# Altium PCB FMM-v1.0.PcbDoc (part 4 of 5)
Units mm, origin at the board's own origin, x right, y up, seen from the top; angles counter-clockwise.
Board outline 115 x 96 mm, 4 copper layers (Top Layer, Power Layer, Ground Layer, Bottom Layer), stack 1.57 mm thick; 218 components, 129 nets, 744 pads, 321 vias.
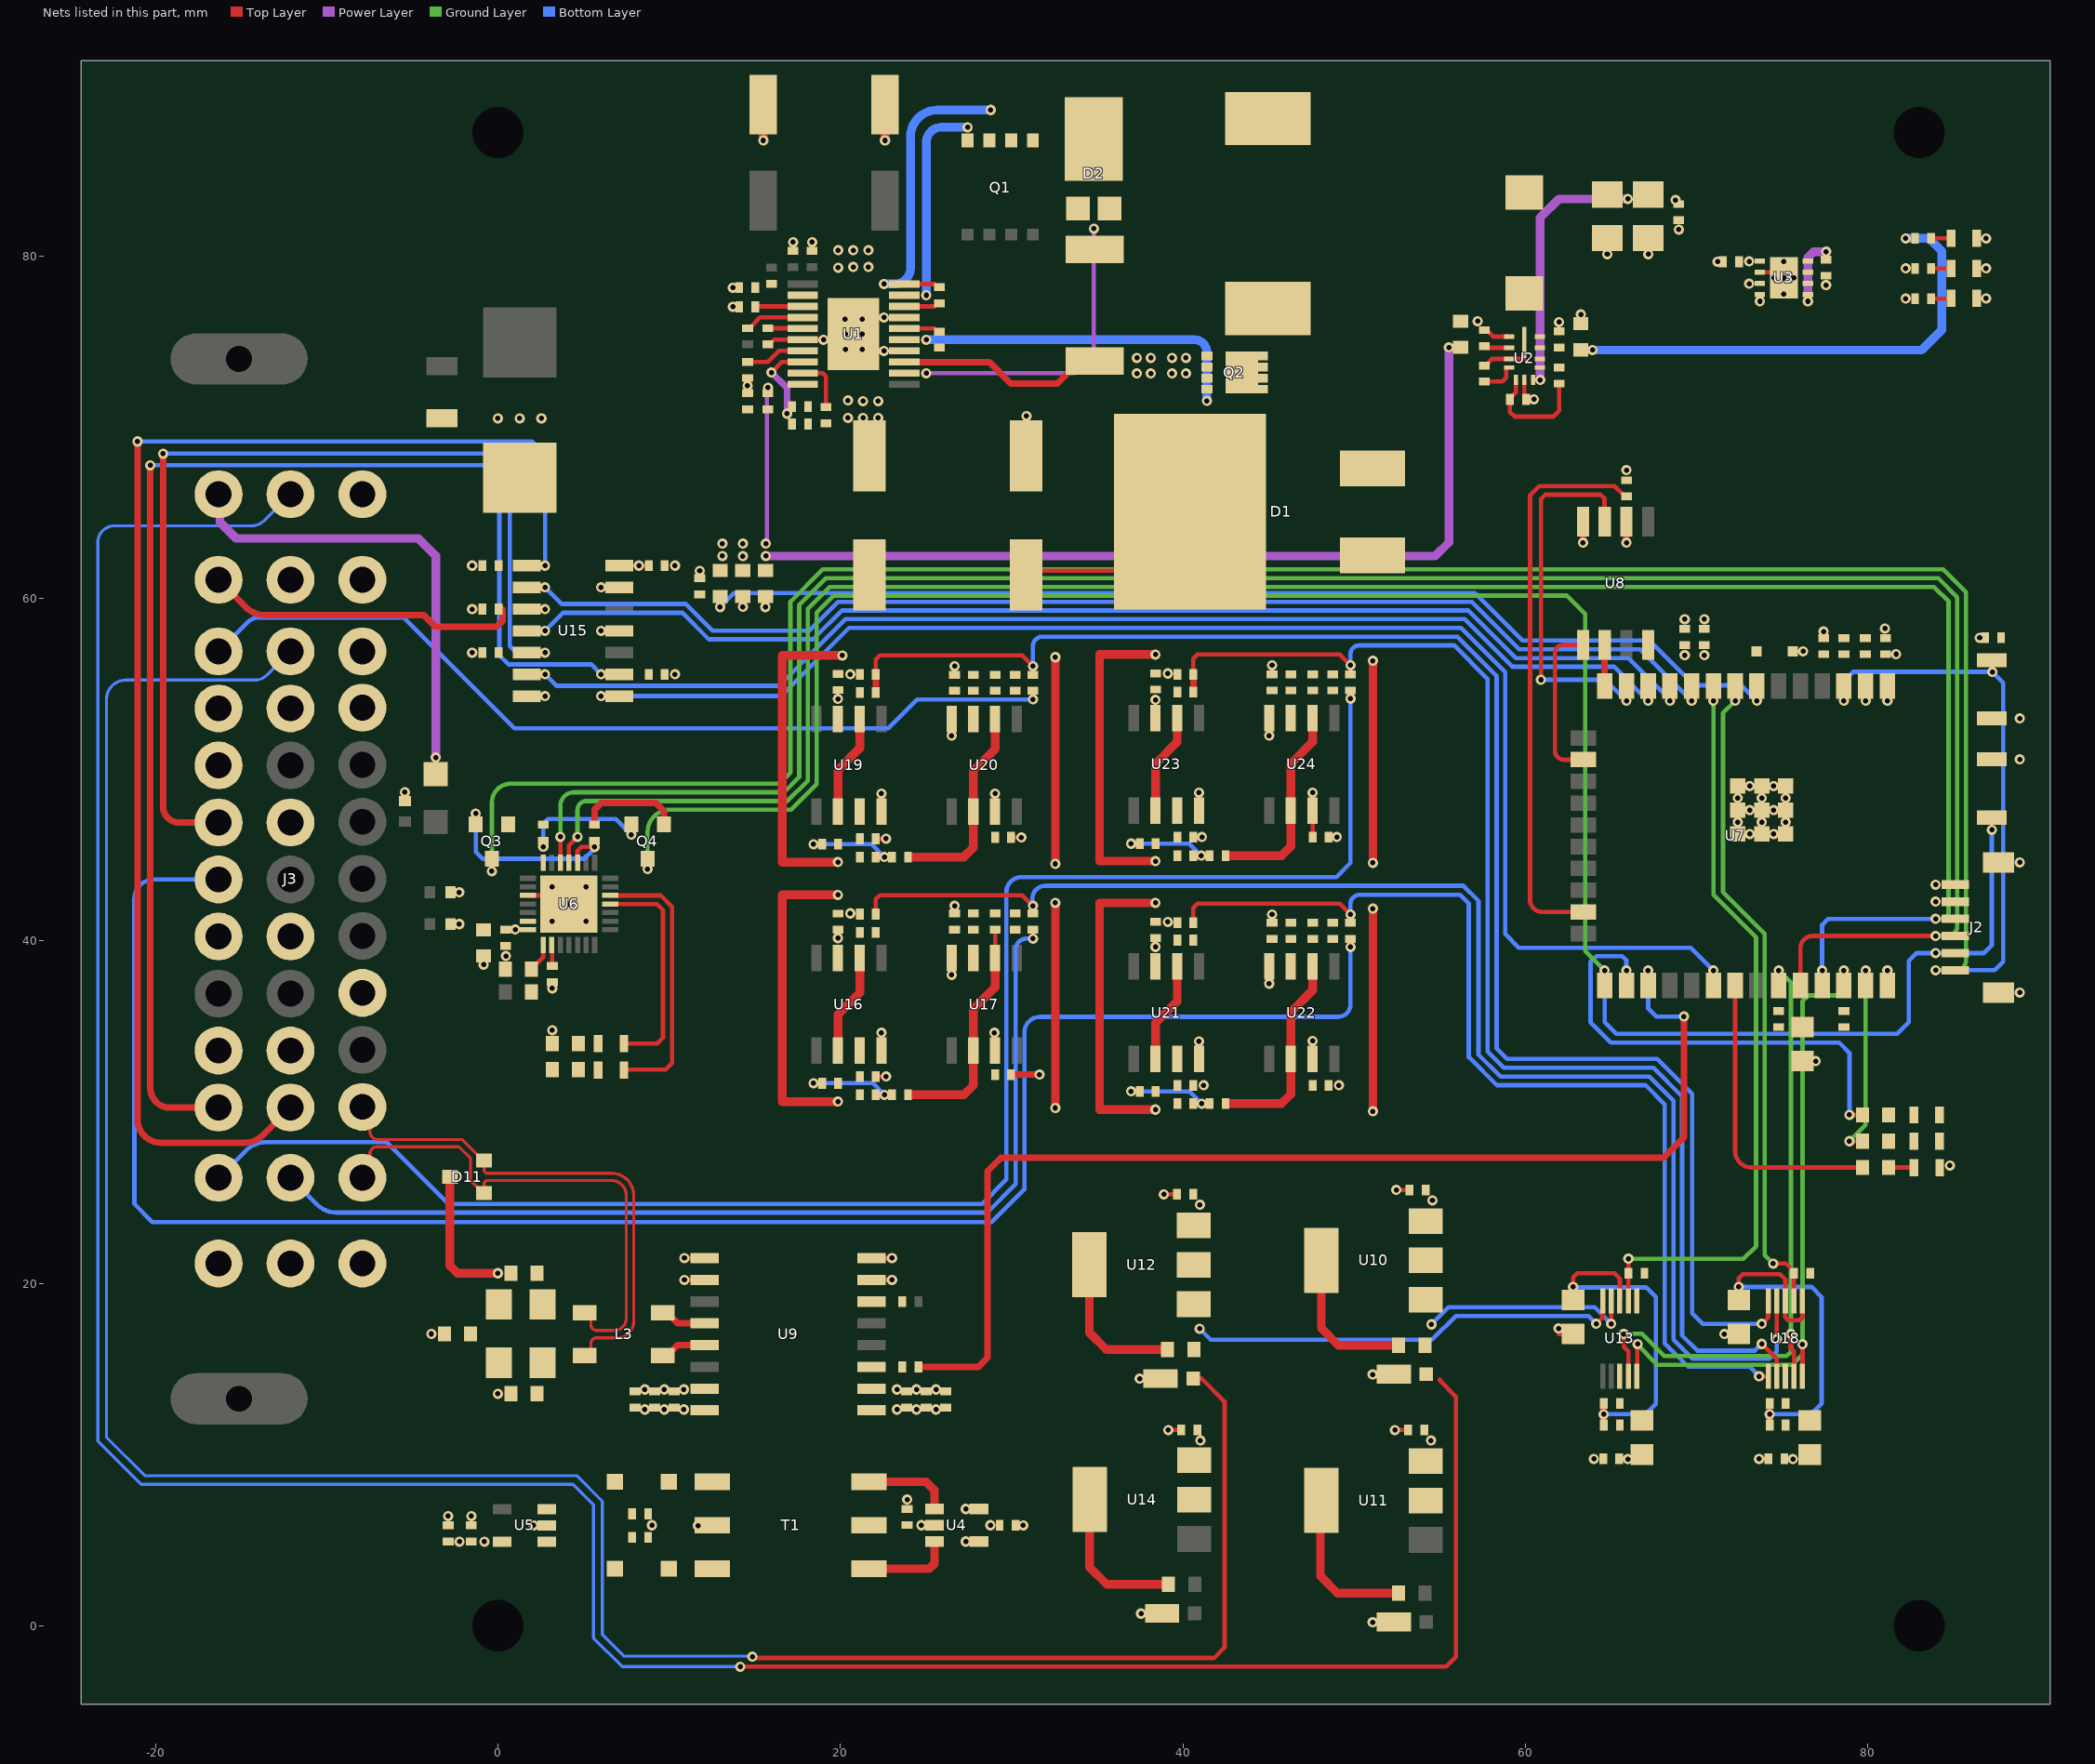
[diagram p4: the nets of this part, all layers, seen from the top]

## Part data (continued)
U16 U17 U19 U20 U21 U22 U23 U24: "IC OPAMP GP 1 CIRCUIT 8SOIC", Case/Package=D, Input Bias Current=10pA, Input Offset Voltage (Vos)=500uV, LCSC Part Number=C13388, Manufacturer="Texas Instruments", Max I/O Voltage=1mV, Max Operating Temperature=85°C, Max Supply Voltage=5.5V, Min Operating Temperature=-40°C, Min Supply Voltage=2.7V, Operating Supply Current=5.2mA, Output Current per Channel=40mA, Package Quantity=2500, Power Supply Rejection Ratio (PSRR)=87.96dB, Supplier Part Number=296-41366-1-ND, Supply Current=7.5mA, Voltage Gain=122dB, Amplifier Type="GENERAL PURPOSE", Bandwidth=38MHz, Category="Amplifiers - Op Amps, Buffer, Instrumentation", Common Mode Rejection Ratio=66dB, ComponentLink1Description=https://datasheet.ciiva.com/1814/opa350-1814331.pdf?src-supplier=Digikey, ComponentLink1URL=https://datasheet.ciiva.com/1814/opa350-1814331.pdf?src-supplier=Digikey, ComponentLink2Description=https://datasheet.ciiva.com/14347/sbos099c-14347229.pdf?src-supplier=Avnet, ComponentLink2URL=https://datasheet.ciiva.com/14347/sbos099c-14347229.pdf?src-supplier=Avnet, Gain Bandwidth Product=38MHz, Item Type=IC, Lead Free="Lead Free", Manufacturer Part Number=OPA350UA/2K5, Number of Channels=1, Number of Circuits=1, Number of Elements=1, Packaging="Tape and Reel", Pins=8, Pricing="1=2.98, 10=2.675, 25=2.5292, 100=2.1921, 250=2.07964, 500=1.86606, 1000=1.57378 (USD)", Radiation Hardening=No, RoHS=Yes, RoHS Compliant=Yes, Series=MicroAmplifier™, Slew Rate=22V/µs, Stock=2896, Supplier=Digikey, Technology=CMOS, Unity Gain Bandwidth Product=38MHz, Weight=0.002677oz

## Free pads (board coordinates)
  round 0 hole 3 unplated: 6(0,0) 6(0,87.2) 6(83,0) 6(83,87.2)

## Via types
v1: diameter 0.6, hole 0.3, Top Layer to Bottom Layer, 297 vias
v2: diameter 0.6, hole 0.3, Top Layer to Bottom Layer, tented both sides, 24 vias

## Nets (pads, with @x,y where several pads share a name; then routed paths per layer and width w, separated by ;. In a path a pad name is that pad's centre, name@x,y a point inside that pad or via, vN(x,y) a via of type N, cw(c..) or ccw(c..) an arc to the next point about the centre after c; other vN are vias at no path point)
3V3: C25.2 C26.2 C27.2 C32.1 C33.2 C35.2 C36.2 C38.2 C39.2 C46.2 C47.1 C48.2 C54.1 C56.1 C57.1 C58.1 C63.1 C65.1 C68.1 C73.1 C75.1 C81.1 C82.1 FB1.1 FB2.2 FB4.2 J2.1 R14.1 R15.1 R18.2 R20.2 R22.2 R27.2 R38.2 R39.2 R40.2 R41.2 T1.2 U3.1 U3.3 U4.2 U6.6 U6.7 U7.2 U8.8 U9.1 U15.11 U15.13 U15.14 U16.7 U17.7 U19.7 U20.7 U21.7 U22.7 U23.7 U24.7 | length 7.8
  Top Layer w0.254: v1(3.176,37.222) R15.1@3.176,37.584 ; U15.14@7.087,61.91 v1(8.231,61.91) C58.1@8.807,61.91 ; v1(28.989,34.634) 28.989,34.381 29.035,34.335 U17.7@29.035,33.592 ; U20.7@29.035,47.553 v1(29.035,48.604) ; U22.7@47.577,33.1 v1(47.577,34.151) ; C81.1@47.577,46.062 U24.7@47.577,47.604 v1(47.577,48.655)
  other v1: 24.726,5.87 28.76,5.87 65.981,9.73 75.625,9.73 23.302,12.631 24.445,12.631 25.588,12.631 76.952,32.97 3.175,34.779 38.403,39.647 19.861,40.164 1.017,40.655 83.96,43.282 79.873,54.012 38.405,54.077 19.861,54.125 10.345,55.56 69.306,56.672 70.449,56.672 81.648,56.738 -1.506,56.83 77.418,58.061 6.02,58.1 -1.506,59.37 6.02,60.64 -1.506,61.91 65.905,67.489 82.211,77.504 73.072,78.376 73.072,79.676
5V: C20.2 C21.2 C22.2 C24.1 D7.2 J3.23 J3.27 J3.31 J3.36 L2.2 R13.1 U2.7 U3.5 U3.8 | length 47.1
  Top Layer w0.254: D7.2@-3.632,49.731 v1(-3.632,50.704) ; U2.7@60.445,72.756 v1(60.866,72.756)
  Power Layer w0.508: J3.27@-16.314,66.081 -16.235,66.003 -16.235,64.449 -15.286,63.5 -4.651,63.5 -3.632,62.481 v1(-3.632,50.704) ; v1(60.866,72.756) 60.866,82.228 61.961,83.322 v1(65.989,83.322) ; v1(76.5,77.346) 76.5,79.9 76.842,80.242 v1(77.566,80.242)
  other v1: 82.211,79.268 68.771,83.258
5V-ISO: C28.2 C29.2 C43.2 C44.1 C45.2 U5.5 U9.16
  other v1: -2.24,4.91 -0.792,4.91 8.57,12.631 9.713,12.631 10.856,12.631
12V: C6.1 C7.1 C8.2 C9.2 C16.2 C17.2 C18.2 C19.2 C49.2 C50.2 C51.2 C55.2 D1.3 R4.2 R7.2 R10.1 U1.10 U2.2 U2.9 U2.10 U10.3 U11.3 U12.3 U14.3 | length 101.7
  Top Layer w0.254: C7.1@30.084,61.617 36.978,61.617 D1.3@40.41,65.049 ; C18.2@57.6,74.724 57.692,74.633 59.043,74.633 U2.2@59.045,74.631
  Power Layer w0.254: v1@15.771,63.199 15.71,63.26 15.71,72.241 v1(15.771,72.301)
  Power Layer w0.508: v1@15.777,62.468 54.731,62.468 55.537,63.274 v1@55.537,74.635
  Bottom Layer w0.508: v1(63.919,74.498) 83.134,74.498 84.328,75.692 84.328,80.263 83.57,81.021 v1(82.211,81.021)
  other v1: 41.021,10.823 54.49,10.823 40.996,24.587 54.576,24.841 13.106,62.468 14.304,62.464 15.65,62.468 14.304,63.189 13.106,63.193 15.65,63.193 55.537,74.651
ACT-LED: R28.2 U7.31 | length 17.7
  Top Layer w0.254: U7.31@72.253,37.388 72.253,27.712 ccw(c73.205,27.712) 73.205,26.76 R28.2@79.697,26.76
ADC: D3.2 R4.1 R6.2 U7.7 | length 64.1
  Top Layer w0.254: v1(12.979,59.495) R4.1@12.979,60.093
  Bottom Layer w0.254: v1(12.979,59.495) 13.788,60.304 57.065,60.304 59.837,57.531 67.25,57.531 69.865,54.917 72.618,54.917 v1(73.523,54.012)
CAN_N: C42.1 D11.1 J3.12 L3.3 R32.1 | length 30.5
  Top Layer w0.178: J3.12@-7.914,26.158 -7.476,26.595 -7.476,27.558 cw(c-7.068,27.558) -7.397,27.8 cw(c-7.068,27.558) -7.31,27.887 cw(c-7.068,27.558) -7.068,27.966 -2.279,27.966 -1.594,27.281 -1.594,25.988 -1.19,25.584 -1.125,25.584 D11.1@-0.803,25.263 -0.803,25.893 -0.699,25.997 6.642,25.997 cw(c6.642,25.146) 7.493,25.146 7.493,17.935 cw(c6.805,17.935) 6.805,17.247 5.771,17.247 cw(c5.771,17.585) 5.433,17.585 5.433,17.912 L3.3@5.071,18.275
CAN_P: C40.2 D11.2 J3.11 L3.4 R29.2 | length 30.7
  Top Layer w0.178: J3.11@-7.914,30.302 -7.476,29.864 -7.476,28.861 ccw(c-7.012,28.861) -7.012,28.398 -2.1,28.398 -1.186,27.484 -1.125,27.484 D11.2@-0.803,27.163 -0.803,26.533 -0.699,26.429 6.642,26.429 cw(c6.642,25.146) 7.925,25.146 7.925,17.756 cw(c6.984,17.756) 6.984,16.816 5.771,16.816 ccw(c5.771,16.478) 5.433,16.478 5.433,16.137 L3.4@5.071,15.775
CS: R27.1 U7.23 U8.2 | length 35.1
  Top Layer w0.254: U7.23@64.008,41.688 U7.23@63.383,41.688 60.98,41.688 cw(c60.98,42.394) 60.713,41.741 cw(c60.98,42.394) 60.327,42.127 cw(c60.98,42.394) 60.274,42.394 60.274,66.015 60.818,66.559 65.208,66.559 65.816,65.951 R27.1@65.905,65.951 ; U8.2@65.905,64.478 U8.2@65.907,64.476 ; v1@65.907,63.252 v1(65.909,63.25)
  Top Layer w0.381: v1@65.907,63.252 U8.2@65.907,64.476
DC_IN: F1.1 J3.1 J3.2
DTR: Q4.2 R17.1 U6.28 | length 7.6
  Top Layer w0.254: v1(7.788,46.197) Q4.2@7.788,46.796
  Bottom Layer w0.254: v1(2.649,45.485) 2.649,46.833 2.92,47.104 6.88,47.104 v1(7.788,46.197)
EN: C34.2 C37.2 J2.6 Q3.3 R22.1 SW2.1 U7.3 | length 158
  Top Layer w0.254: v1(-0.356,44.063) Q3.3@-0.356,44.796
  Ground Layer w0.254: v1(-0.356,44.063) -0.356,48.062 cw(c0.761,48.062) -0.15,48.708 cw(c0.761,48.062) 0.115,48.973 cw(c0.761,48.062) 0.761,49.178 16.422,49.178 17.083,49.84 17.083,59.805 18.975,61.697 84.4,61.697 85.732,60.364 85.732,38.847 cw(c85.168,38.847) 85.168,38.282 v1(83.96,38.282)
  Bottom Layer w0.254: v1(78.603,54.012) 78.603,55.159 79.146,55.702 v1(87.274,55.702) 87.909,55.067 87.909,38.771 87.42,38.282 v1(83.96,38.282)
FLOW-RDN-1: U7.10 U15.2 | length 71.1
  Bottom Layer w0.254: v1(2.755,60.64) 3.727,59.668 10.984,59.668 12.537,58.115 18.19,58.115 19.871,59.796 56.879,59.796 59.651,57.023 66.702,57.023 v1(69.713,54.012)
FLOW-RDN-2: U7.11 U15.4 | length 69.7
  Bottom Layer w0.254: v1(2.755,58.1) 3.811,59.156 10.778,59.156 12.326,57.607 18.401,57.607 20.081,59.288 56.669,59.288 59.441,56.515 66.017,56.515 68.443,54.089 v1(68.443,54.012)
FLOW-RDN-3: U7.12 U15.6 | length 68.3
  Bottom Layer w0.254: v1(2.755,55.56) 3.425,54.889 16.401,54.889 20.291,58.78 56.459,58.78 59.231,56.007 65.178,56.007 v1(67.173,54.012)
FLOW-RDN-4: U7.30 U15.8 | length 83.9
  Bottom Layer w0.254: v1(6.02,54.29) 16.52,54.29 20.502,58.272 56.248,58.272 58.825,55.695 58.825,40.395 59.621,39.599 69.648,39.599 v1(70.983,38.264)
FLOW-SNS-1: J3.24 R38.1 U15.1 | length 80.7
  Top Layer w0.381: v1(-21.044,69.159) -21.047,69.156 -21.047,29.572 ccw(c-19.686,29.572) -19.686,28.212 -14.793,28.212 ccw(c-14.793,29.732) -13.718,28.657 J3.24@-12.114,30.261
  Bottom Layer w0.254: v1(-21.044,69.159) 1.995,69.159 2.755,68.398 v1(2.755,61.91)
FLOW-SNS-2: J3.28 R39.1 U15.3 | length 18.7
  Top Layer w0.381: J3.28@-16.314,61.081 -14.709,59.477 ; -14.708,59.476 ccw(c-13.587,60.599) -13.587,59.012 -4.326,59.012 -3.66,58.347 -0.073,58.347 0.285,58.704 0.285,59.32 0.235,59.37 R39.1@0.031,59.37
  other v1: 2.755,59.37
FLOW-SNS-3: J3.32 R40.1 U15.5 | length 57.5
  Top Layer w0.381: v1(-19.555,68.448) -19.558,68.445 -19.558,47.837 ccw(c-18.632,47.837) -19.512,47.551 ccw(c-18.632,47.837) -18.919,46.957 ccw(c-18.632,47.837) -18.632,46.911 J3.32@-16.314,46.911
  Bottom Layer w0.254: v1(-19.555,68.448) -0.282,68.448 0.687,67.479 0.687,57.205 1.062,56.83 v1(2.755,56.83)
FLOW-SNS-4: J3.37 R41.1 U15.9 | length 78.5
  Top Layer w0.381: v1(-20.302,67.767) -20.302,31.397 ccw(c-19.167,31.397) -19.167,30.261 J3.37@-16.314,30.261
  Bottom Layer w0.254: v1(-20.302,67.767) -0.51,67.767 0.085,67.173 0.085,56.681 0.622,56.144 5.436,56.144 v1(6.02,55.56)
GND: C1.1 C3.2 C4.2 C5.1 C6.2 C7.2 C8.1 C9.1 C10.1 C11.1 C14.1 C16.1 C17.1 C18.1 C19.1 C20.1 C21.1 C22.1 C23.1 C24.2 C25.1 C26.1 C27.1 C32.2 C33.1 C34.1 C35.1 C36.1 C37.1 C38.1 C39.1 C46.1 C47.2 C48.1 C49.1 C50.1 C51.1 C54.2 C55.1 C56.2 C57.2 C58.2 C59.1 C60.1 C61.1 C63.2 C65.2 C68.2 C69.1 C70.1 C71.1 C73.2 C75.2 C76.1 C77.1 C78.1 C81.2 C82.2 C83.1 C84.1 C85.1 D3.1 D4.2 D8.1 D9.1 D10.1 D12.1 D13.1 D14.1 D15.1 FB3.2 FB5.2 J2.2 J2.MP1 J2.MP2 J3.3 J3.4 J3.9 J3.15 J3.17 J3.19 J3.21 J3.26 J3.30 J3.34 J3.39 LED1.2 LED2.2 LED3.2 LED6.2 LED7.2 LED8.2 Q2.1 Q2.2 Q2.3 R3.1 R5.2 R6.1 R8.1 R11.1 R19.1 SW1.2 SW2.2 U1.6 U1.13 U1.14 U1.17 U1.21 U2.1 U2.6 U2.11 U3.2 U3.4 U3.6 U3.7 U3.9 U4.4 U4.5 U6.3 U6.29 U7.1 U7.38 U7.39 U8.4 U9.2 U9.7 U9.8 U15.7 U16.4 U17.4 U19.4 U20.4 U21.4 U22.4 U23.4 U24.4 | length 187.7
  Top Layer w0.254: D10.1@-2.776,40.977 v1(-2.262,40.977) ; D9.1@-2.776,42.831 v1(-2.262,42.831) ; v1(-0.838,38.602) C33.1@-0.838,39.116 ; U6.3@1.749,42.651 2.826,42.651 3.649,42.651 v2(4.149,42.151) ; v1(13.728,77.024) 14.093,77.024 R8.1@14.094,77.025 ; v1(13.728,78.141) 14.093,78.141 R3.1@14.094,78.142 ; v1(14.3,59.499) C8.1@14.3,60.096 ; v1(15.624,59.495) C9.1@15.624,60.093 ; C11.1@15.771,74.831 15.86,74.831 16.131,75.102 U1.6@17.172,75.102 ; U1.6@17.795,75.102 20.44,75.102 U1.21@20.765,75.427 ; U9.7@21.827,20.2 v1(23.013,20.2) ; U9.8@21.827,21.47 v1(23.013,21.47) ; C60.1@22.07,32.076 v1(22.668,32.076) ; C70.1@22.07,45.96 v1(22.668,45.96) ; v1(26.495,38.01) U17.4@26.495,38.992 ; v1(26.495,51.98) U20.4@26.495,52.953 ; C63.2@29.975,46.037 v1(30.572,46.037) ; C26.1@30.239,5.87 C26.1@30.239,5.87 30.671,5.869 v1(30.672,5.868) ; v1(38.889,25.197) C51.1@39.657,25.197 ; v1(39.143,11.433) C55.1@39.911,11.433 ; C84.1@40.612,46.062 v1(41.115,46.062) ; v1(45.037,37.502) U22.4@45.037,38.5 ; v1(45.037,51.98) U24.4@45.037,53.004 ; C85.1@45.21,55.562 v1(45.21,56.09) ; C81.2@48.517,46.062 48.519,46.064 49.11,46.064 v1@49.113,46.067 ; v1(51.087,0.205) 52.304,0.205 D13.1@52.316,0.217 ; v1(52.383,11.433) C50.1@53.151,11.433 ; v1(52.47,25.451) C49.1@53.238,25.451 ; C18.1@57.41,75.765 57.512,75.664 C18.1@57.6,75.664 ; C18.1@57.583,75.735 57.756,75.562 57.856,75.562 58.138,75.281 U2.1@59.045,75.281 ; U2.6@59.945,72.756 59.945,71.825 60.069,71.701 C23.1@60.069,71.613 ; 61.945,17.034 FB3.2@62.789,17.034 ; C16.1@63.239,76.032 v1(63.239,76.578) ; v1(64.785,80.099) C21.1@64.785,81.036 ; C20.1@67.176,81.036 67.183,81.029 v1(67.183,80.099) ; v1(71.622,17.034) FB5.2@72.466,17.034 ; U3.2@73.7,79.037 74.735,79.037 75.06,78.712 U3.9@75.1,78.712 ; U7.39@74.503,49.034 U7.39@73.803,49.034 U7.39@73.103,49.034 U7.39@72.403,49.034 U7.39@72.403,48.334 U7.39@72.403,47.634 U7.39@72.403,46.934 U7.39@72.403,46.234 U7.39@73.103,46.234 U7.39@73.803,46.234 U7.39@74.503,46.234 U7.39@75.203,46.234 U7.39@75.203,46.934 U7.39@75.203,47.634 U7.39@75.203,48.334 U7.39@75.203,49.034 ; LED3.2@86.36,77.516 v1(86.906,77.516) ; LED2.2@86.36,79.268 v1(86.906,79.268) ; LED1.2@86.36,81.021 v1(86.906,81.021)
  Top Layer w0.381: U1.13@23.735,73.802 28.694,73.802 29.953,72.542 32.661,72.542 33.335,73.216 33.335,73.254 33.944,73.863 R5.2@34.844,73.863 ; C56.2@29.975,32.185 v2(31.623,32.185) ; v1@63.365,63.254 U8.4@63.365,64.478
  Top Layer w0.508: v1(15.494,86.741) C3.2@15.494,88.83 ; v1(19.86,30.612) 16.597,30.612 16.597,42.681 v1(19.86,42.681) ; v1(19.86,44.597) 16.596,44.597 16.596,56.667 v1(20.114,56.667) ; v1(22.606,86.741) C4.2@22.606,88.83 ; v1(32.556,30.238) v1(32.556,42.221) ; v1(32.556,44.493) v1(32.556,56.562) ; v1(38.402,30.145) 35.139,30.145 35.139,42.214 v1(38.402,42.214) ; v1(38.402,44.652) 35.139,44.652 35.139,56.722 v1(38.402,56.722) ; v1(51.098,30.04) v1(51.098,41.878) ; v1(51.098,44.548) v1(51.098,56.353)
  other v1: 37.561,0.711 27.326,4.92 27.326,6.82 23.901,7.372 64.005,9.746 73.649,9.746 23.302,13.799 24.445,13.799 25.588,13.799 37.473,14.425 51.087,14.679 61.945,17.364 84.785,26.873 41.21,31.559 49.114,31.559 40.942,34.126 22.4,34.634 88.879,36.982 81.143,38.264 0.471,39.116 39.116,41.109 45.21,41.536 20.574,41.6 26.668,42.04 83.96,42.282 88.879,44.582 48.986,46.067 22.4,48.604 40.942,48.655 -5.436,48.677 88.879,50.595 88.879,52.981 81.143,54.012 2.755,54.29 20.574,55.562 39.116,55.612 26.668,56.039 76.221,56.903 86.533,57.698 81.001,58.242 69.306,58.782 70.449,58.782 11.786,61.609 10.345,61.91 63.369,63.25 0,70.506 1.27,70.506 2.54,70.506 30.863,70.642 60.497,71.618 14.58,72.415 37.313,73.127 38.125,73.127 39.37,73.127 40.183,73.127 37.313,74.041 38.125,74.041 39.37,74.041 40.183,74.041 22.541,74.451 19.014,75.104 61.969,76.134 57.218,76.179 22.541,76.401 73.7,77.346 77.561,78.292 71.222,79.656 17.231,80.797 18.349,80.797 68.961,81.534
  other v2: 3.163,41.151 5.149,41.151 3.176,43.151 5.149,43.151 20.44,70.535 21.321,70.535 22.202,70.535 21.321,71.514 22.202,71.514 20.44,71.551 20.307,74.545 21.285,74.545 20.307,75.426 21.285,75.426 20.269,76.307 21.285,76.307 19.874,79.306 20.755,79.344 21.636,79.344 19.874,80.322 20.755,80.322 21.636,80.322
IO0: J2.5 Q4.3 SW1.1 U7.25 | length 127.9
  Top Layer w0.254: v1(8.738,44.19) Q4.3@8.738,44.796
  Ground Layer w0.254: v1(8.738,44.19) 8.738,46.338 cw(c10.054,46.338) 8.79,46.707 cw(c10.054,46.338) 9.685,47.602 cw(c10.054,46.338) 10.054,47.654 17.122,47.654 18.607,49.14 18.607,59.174 19.589,60.155 62.425,60.155 63.5,59.08 63.5,39.397 v1(64.633,38.264)
  Bottom Layer w0.254: v1(64.633,38.264) 64.633,35.24 65.303,34.569 81.712,34.569 82.398,35.255 82.398,38.826 82.854,39.282 v1(83.96,39.282) 86.78,39.282 87.243,39.745 v1(87.243,46.482)
IO4: R24.1 U7.26 | length 26.7
  Top Layer w0.254: v1(78.929,29.833) R24.1@79.697,29.833
  Bottom Layer w0.254: v1(65.903,38.264) 65.903,38.861 65.654,39.111 64.14,39.111 63.805,38.775 63.805,35.253 64.999,34.059 78.334,34.059 78.929,33.464 v1(78.929,29.833)
IO23: R23.1 U7.37 | length 11.1
  Top Layer w0.254: v1(78.929,28.297) R23.1@79.697,28.297
  Ground Layer w0.254: v1(78.929,28.297) 79.873,29.241 v1(79.873,38.264)
IO32: R48.1 U7.8 U18.2 | length 37.5
  Top Layer w0.254: v1(74.472,21.151) 75.212,21.151 75.689,20.675 R48.1@75.689,20.586 ; U18.2@75.684,18.976 R48.1@75.684,20.556
  Ground Layer w0.254: v1(72.253,54.012) 71.544,53.303 71.544,42.845 73.984,40.405 73.984,21.654 74.472,21.166 v1(74.472,21.151)
IO33: R36.1 U7.9 U13.2 | length 43.1
  Top Layer w0.254: U13.2@66.015,18.976 R36.1@66.015,20.556 ; R36.1@66.019,20.586 v1(66.019,21.43)
  Ground Layer w0.254: v1(66.019,21.43) 72.738,21.43 73.476,22.168 73.476,40.195 70.983,42.688 v1(70.983,54.012)
ISO-GND: C28.1 C29.1 C30.1 C31.1 C40.1 C41.2 C42.2 C43.1 C44.2 C45.1 D11.3 J3.13 T1.5 U5.2 U9.9 U9.10 U9.15 | length 10.5
  Top Layer w0.254: v1(10.89,20.2) U9.10@12.077,20.2 ; v1(10.89,21.47) U9.9@12.077,21.47
  Top Layer w0.508: D11.3@-2.803,26.213 -2.803,21.028 -2.362,20.587 v1(-0.003,20.587)
  other v1: 2.083,5.86 11.684,5.842 9.001,5.87 -2.907,6.404 -1.553,6.404 -0.003,13.545 8.57,13.799 9.713,13.799 10.856,13.799 -3.892,17.043
MISO: U7.14 U8.6 | length 2.4
  Top Layer w0.254: U7.14@64.633,54.888 U7.14@64.633,54.888
  Top Layer w0.381: U7.14@64.633,54.888 U8.6@64.635,57.278
MOSI: U7.16 U8.5 | length 9.6
  Top Layer w0.254: U8.5@63.365,57.278 62.194,57.278 ccw(c62.194,56.806) 62.014,57.242 ccw(c62.194,56.806) 61.757,56.986 ccw(c62.194,56.806) 61.722,56.806 61.722,51.108 ccw(c62.252,51.108) 61.778,50.871 ccw(c62.252,51.108) 62.015,50.634 ccw(c62.252,51.108) 62.252,50.578 U7.16@63.383,50.578
NetC1_2: C1.2 U1.16 | length 2.1
  Top Layer w0.254: U1.16@23.735,75.752 25.518,75.752 25.692,75.578 C1.2@25.781,75.578
NetC2_1: C2.1 D2.3 L1.1 Q1.1 Q1.2 Q1.3 U1.20 | length 17.5
  Top Layer w0.254: U1.20@23.735,78.352 25.512,78.352 25.692,78.172 C2.1@25.781,78.172
  Bottom Layer w0.508: v1(22.541,78.355) 23.169,78.355 ccw(c23.169,79.277) 23.498,78.416 ccw(c23.169,79.277) 24.029,78.948 ccw(c23.169,79.277) 24.09,79.277 24.09,86.943 cw(c25.666,86.943) 24.192,87.5 cw(c25.666,86.943) 25.109,88.417 cw(c25.666,86.943) 25.666,88.519 v1(28.778,88.519)
NetC2_2: C2.2 U1.18 | length 2.1
  Top Layer w0.254: U1.18@23.735,77.052 25.512,77.052 25.692,77.232 C2.2@25.781,77.232
NetC10_2: C10.2 U1.7 | length 3.5
  Top Layer w0.254: C10.2@14.577,73.806 15.771,73.806 16.416,74.452 U1.7@17.795,74.452
NetC11_2: C11.2 U1.5 | length 2
  Top Layer w0.254: C11.2@15.771,75.771 17.776,75.771 U1.5@17.795,75.752
NetC12_1: C12.1 C13.2 U1.9 | length 3.2
  Top Layer w0.254: U1.9@17.795,73.152 18.972,73.152 19.152,72.972 C12.1@19.152,71.158
NetC12_2: C12.2 R9.1
NetC13_1: C13.1 R7.1 R9.2 R11.2 U1.8 | length 4.8
  Top Layer w0.254: v1(15.977,73.19) 16.589,73.802 U1.8@17.795,73.802
  Power Layer w0.381: v1(15.977,73.19) 16.879,72.287 v1(16.879,70.79)
NetC15_1: C15.1 U2.4 | length 2.1
  Top Layer w0.254: C15.1@57.6,72.654 58.652,72.654 58.878,72.88 58.878,73.479 58.88,73.481 U2.4@59.045,73.481
NetC15_2: C15.2 L2.1 U2.3 U2.12 | length 2.5
  Top Layer w0.254: C15.2@57.6,73.594 57.689,73.594 58.076,73.981 U2.3@59.045,73.981 59.945,73.981
NetC23_2: C23.2 R12.1 U2.5 | length 6.7
  Top Layer w0.254: U2.5@59.445,72.756 59.445,72.027 59.221,71.803 59.206,71.803 59.104,71.701 C23.2@59.104,71.613 59.104,70.882 59.37,70.616 61.643,70.616 61.969,70.942 R12.1@61.969,72.54
NetC30_2: C30.2 C31.2 D5.2 D6.2 U5.1 U5.3
NetC41_1: C41.1 R29.1 R32.2
NetC52_1: C52.1 C53.1 FB2.1 R36.2 U13.1 U13.8
NetC52_2: C52.2 C53.2 FB3.1 U13.3 | length 21.4
  Top Layer w0.254: FB3.1@62.789,19.034 v1(62.789,19.787) 62.789,20.332 63.043,20.586 65.216,20.586 65.515,20.287 U13.3@65.515,18.976
  Top Layer w0.381: C53.2@64.579,11.721 v1(64.579,12.356) C52.2@64.579,12.991
  Bottom Layer w0.254: v1(62.789,19.787) 62.814,19.761 67.056,19.761 67.615,19.202 67.615,12.954 67.017,12.356 v1(64.579,12.356)
NetC60_2: C60.2 R45.2 U16.3
NetC61_2: C61.2 R47.2 U17.3
NetC62_1: C62.1 R44.2 R45.1 | length 4.9
  Top Layer w0.254: v1(18.429,31.682) C62.1@18.932,31.682
  Bottom Layer w0.254: v1(18.429,31.682) 21.892,31.682 v1(22.566,31.009)
NetC62_2: C62.2 R43.1 U16.2 U16.6 | length 5.9
  Top Layer w0.508: U16.2@19.86,33.592 19.86,35.695 21.13,36.965 U16.6@21.13,38.992
NetC64_1: C64.1 R46.2 R47.1
NetC64_2: C64.2 R44.1 U17.2 U17.6 | length 13.6
  Top Layer w0.254: U17.2@29.035,38.992 C64.2@29.035,40.653
  Top Layer w0.508: R44.1@24.048,31.009 27.214,31.009 27.765,31.56 27.765,36.021 29.035,37.291 U17.2@29.035,38.992
NetC66_1: C66.1 C67.1 FB4.1 R48.2 U18.8
NetC66_2: C66.2 C67.2 FB5.1 U18.1 U18.3 | length 24.4
  Top Layer w0.254: FB5.1@72.458,19.034 72.458,19.41 72.458,20.297 72.699,20.537 74.872,20.537 75.184,20.226 U18.3@75.184,18.976 75.184,18 75.333,17.851 76.022,17.851 76.184,18.013 U18.1@76.184,18.976
  Top Layer w0.381: C66.2@74.265,11.721 v1(74.265,12.356) C67.2@74.265,12.991
  Bottom Layer w0.254: v1@72.474,19.787 76.716,19.787 77.3,19.202 77.3,12.954 76.702,12.356 v1(74.265,12.356)
  other v1: 72.458,19.787
NetC70_2: C70.2 R52.2 U19.3
NetC71_2: C71.2 R54.2 U20.3
NetC72_1: C72.1 R51.2 R52.1 | length 5
  Top Layer w0.254: v1(18.429,45.645) C72.1@18.932,45.645
  Bottom Layer w0.254: v1(18.429,45.645) 21.814,45.645 v1(22.566,44.894)
NetC72_2: C72.2 R50.1 U19.2 U19.6 | length 5.9
  Top Layer w0.508: U19.2@19.86,47.553 19.86,49.978 21.13,51.248 U19.6@21.13,52.953
NetC74_1: C74.1 R53.2 R54.1
NetC74_2: C74.2 R51.1 U20.2 U20.6 | length 12
  Top Layer w0.508: R51.1@24.048,44.894 27.214,44.894 27.765,45.444 U20.6@27.765,47.553 27.765,49.936 29.035,51.206 U20.2@29.035,52.953
NetC77_2: C77.2 R58.2 U21.3
NetC78_2: C78.2 R60.2 U22.3
NetC79_1: C79.1 R57.2 R58.1 | length 4.9
  Top Layer w0.254: v1(36.97,31.208) C79.1@37.473,31.208
  Bottom Layer w0.254: v1(36.97,31.208) 40.391,31.208 v1(41.108,30.492)
NetC79_2: C79.2 R56.1 U21.2 U21.6 | length 5.9
  Top Layer w0.508: U21.2@38.402,33.1 38.402,35.203 39.672,36.473 U21.6@39.672,38.5
NetC80_1: C80.1 R59.2 R60.1
NetC80_2: C80.2 R57.1 U22.2 U22.6 | length 12
  Top Layer w0.508: R57.1@42.59,30.492 45.756,30.492 46.307,31.042 U22.6@46.307,33.151 ; U22.6@46.307,33.1 46.307,35.843 47.577,37.113 U22.2@47.577,38.5
NetC84_2: C84.2 R64.2 U23.3
NetC85_2: C85.2 R66.2 U24.3
NetC86_1: C86.1 R63.2 R64.1 | length 4.9
  Top Layer w0.254: v1(36.97,45.674) C86.1@37.473,45.674
  Bottom Layer w0.254: v1(36.97,45.674) 40.371,45.674 v1(41.075,44.971)
NetC86_2: C86.2 R62.1 U23.2 U23.6 | length 5.9
  Top Layer w0.508: U23.2@38.402,47.604 38.402,50.346 39.672,51.616 U23.6@39.672,53.004
NetC87_1: C87.1 R65.2 R66.1
NetC87_2: C87.2 R63.1 U24.2 U24.6 | length 12
  Top Layer w0.508: R63.1@42.59,44.97 45.756,44.97 46.307,45.52 U24.6@46.307,47.629 ; U24.6@46.307,47.604 46.307,50.346 47.577,51.616 U24.2@47.577,53.004
NetD1_1: D1.1 D1.2 L1.2 Q2.5 Q2.6 Q2.7 Q2.8
NetD2_1: D2.1 D2.2 R5.1 U1.12 | length 17.6
  Power Layer w0.254: v1(25.019,73.149) 33.68,73.149 34.798,74.267 v1(34.798,81.591)
NetD5_1: D5.1 T1.6
NetD6_1: D6.1 T1.4
NetFB1_2: FB1.2 R25.1 R26.1
NetL3_1: L3.1 U9.13 | length 2.7
  Top Layer w0.381: L3.1@9.631,15.775 9.881,15.775 10.496,16.39 U9.13@12.077,16.39
NetL3_2: L3.2 U9.12 | length 2.7
  Top Layer w0.381: L3.2@9.631,18.275 9.881,18.275 10.496,17.66 U9.12@12.077,17.66
NetLED1_1: LED1.1 R10.2 | length 1.2
  Top Layer w0.254: R10.2@83.697,81.021 LED1.1@84.86,81.021
NetLED2_1: LED2.1 R13.2 | length 1.2
  Top Layer w0.254: R13.2@83.697,79.268 LED2.1@84.86,79.268
NetLED3_1: LED3.1 R14.2 | length 1.2
  Top Layer w0.254: R14.2@83.697,77.504 84.848,77.504 LED3.1@84.86,77.516
NetLED4_1: LED4.1 R18.1
NetLED4_2: LED4.2 U6.19 | length 16
  Top Layer w0.254: U6.19@6.549,42.651 9.505,42.651 10.177,41.98 10.177,32.865 9.786,32.474 7.367,32.474 LED4.2@7.354,32.461
NetLED5_1: LED5.1 R20.1
NetLED5_2: LED5.2 U6.18 | length 13.1
  Top Layer w0.254: U6.18@6.549,42.151 9.287,42.151 9.641,41.798 9.641,34.34 9.299,33.998 LED5.2@7.354,33.998
NetLED6_1: LED6.1 R23.2
NetLED7_1: LED7.1 R24.2
NetLED8_1: LED8.1 R28.1 | length 1.5
  Top Layer w0.254: R28.1@81.221,26.76 LED8.1@82.697,26.76
NetQ1_4: Q1.4 U1.19 | length 11.8
  Bottom Layer w0.508: v1(25.019,77.699) 25.019,86.622 cw(c25.906,86.622) 25.164,87.108 cw(c25.906,86.622) 25.42,87.364 cw(c25.906,86.622) 25.906,87.509 v1(27.432,87.509)
NetQ2_4: Q2.4 U1.15 | length 19.6
  Bottom Layer w0.508: v1(25.019,75.099) 40.676,75.099 cw(c40.676,74.373) 41.045,74.998 cw(c40.676,74.373) 41.301,74.742 cw(c40.676,74.373) 41.402,74.373 v1(41.402,71.533)
NetQ3_1: Q3.1 R17.2
NetQ4_1: Q4.1 R21.2 | length 6.1
  Top Layer w0.381: R21.2@5.639,46.787 5.639,47.658 6.02,48.039 9.24,48.039 9.688,47.592 Q4.1@9.688,46.796
NetR1_1: R1.1 R3.2 U1.2
NetR2_1: R2.1 U1.4 | length 3.5
  Top Layer w0.254: R2.1@14.577,75.771 14.679,75.872 14.777,75.872 15.307,76.402 U1.4@17.795,76.402
NetR8_2: R8.2 U1.3 | length 2.8
  Top Layer w0.254: R8.2@15.034,77.025 15.061,77.052 U1.3@17.795,77.052
NetR12_2: R12.2 U2.8
NetR15_2: R15.2 U6.9 | length 1.2
  Top Layer w0.254: U6.9@3.149,39.751 3.163,39.738 3.163,38.537 R15.2@3.176,38.524
NetR16_2: R16.2 R19.2 U6.8 | length 1.7
  Top Layer w0.254: R19.2@1.969,38.333 1.969,38.397 2.223,38.651 2.245,38.651 2.649,39.055 U6.8@2.649,39.751
NetR30_2: R30.2 U9.3
NetR31_2: R31.2 U9.6
NetR33_1: R33.1 U10.2 U10.4 | length 8.9
  Top Layer w0.508: U10.4@48.086,21.337 48.086,17.38 49.083,16.384 R33.1@52.605,16.384
NetR34_1: R34.1 U11.2 U11.4 | length 8.9
  Top Layer w0.508: U11.4@48.031,6.863 48.031,2.907 49.028,1.91 R34.1@52.605,1.91
NetR35_1: R35.1 U12.2 U12.4 | length 8.9
  Top Layer w0.508: U12.4@34.537,21.083 34.537,17.126 35.534,16.13 R35.1@39.111,16.13
NetR37_1: R37.1 U14.2 U14.4 | length 8.9
  Top Layer w0.508: U14.4@34.559,7.369 34.559,3.413 35.555,2.416 R37.1@39.133,2.416
NetT1_1: T1.1 U4.3 | length 5.2
  Top Layer w0.508: T1.1@21.661,3.33 25.189,3.33 25.494,3.635 U4.3@25.494,4.92
NetT1_3: T1.3 U4.1 | length 5.1
  Top Layer w0.508: T1.3@21.661,8.41 24.991,8.41 25.494,7.907 U4.1@25.494,6.82
RTS: Q3.2 R21.1 U6.24 | length 12.5
  Top Layer w0.254: Q3.2@-1.306,46.796 -1.295,46.806 v1(-1.295,47.428) ; U6.24@4.649,44.551 4.649,45.266 4.864,45.481 v1(5.638,45.481) 5.639,45.482 R21.1@5.639,45.847
  Bottom Layer w0.254: v1(-1.295,47.428) -1.295,45.193 -0.897,44.795 5.048,44.795 5.465,45.212 5.465,45.214 5.638,45.387 v1(5.638,45.481)
RXD: J2.3 U6.25 U7.35 | length 123.6
  Top Layer w0.254: U6.25@4.149,44.551 4.149,45.576 v1(4.649,46.076)
  Ground Layer w0.254: v1(4.649,46.076) 4.649,47.644 cw(c5.167,47.644) 5.167,48.162 16.911,48.162 18.099,49.351 18.099,59.384 19.379,60.663 83.863,60.663 84.716,59.81 84.716,41.701 cw(c84.298,41.701) 84.655,41.482 cw(c84.298,41.701) 84.517,41.344 cw(c84.298,41.701) 84.298,41.282 v1(83.96,41.282)
  Bottom Layer w0.254: v1(77.333,38.264) 77.333,40.935 77.681,41.282 v1(83.96,41.282)
RXD0: J2.4 U6.26 U7.34 | length 128.2
  Top Layer w0.254: U6.26@3.649,44.551 v1(3.649,46.076) ; U7.34@76.063,37.388 76.063,39.577 cw(c76.768,39.577) 76.116,39.844 cw(c76.768,39.577) 76.501,40.23 cw(c76.768,39.577) 76.768,40.282 v1(83.96,40.282)
  Ground Layer w0.254: v1(3.649,46.076) 3.649,47.89 cw(c4.43,47.89) 3.681,48.11 cw(c4.43,47.89) 4.21,48.639 cw(c4.43,47.89) 4.43,48.67 16.701,48.67 17.591,49.561 17.591,59.595 19.168,61.171 84.117,61.171 85.224,60.064 85.224,40.864 cw(c84.642,40.864) 85.168,40.614 cw(c84.642,40.864) 84.892,40.339 cw(c84.642,40.864) 84.642,40.282 v1(83.96,40.282)
RXD2: R30.1 U7.27 | length 68.2
  Top Layer w0.381: R30.1@24.559,15.118 28.065,15.118 28.6,15.653 28.6,26.543 29.388,27.33 68.06,27.33 69.263,28.533 v1(69.263,35.582)
  Bottom Layer w0.254: v1(67.173,38.264) 67.173,36.053 67.643,35.582 v1(69.263,35.582)
SCL: R25.2 U7.36 U13.10 U18.10 | length 38.6
  Top Layer w0.254: U13.10@66.515,14.576 66.515,15.155 66.533,15.174 66.533,16.432 v1(66.552,16.451) ; U18.10@76.184,14.576 v1(76.184,16.434)
  Ground Layer w0.254: v1(66.552,16.451) 66.552,16.397 67.706,15.243 75.591,15.243 76.184,15.836 v1(76.184,16.434) 76.184,36.473 76.517,36.807 78.326,36.807 78.603,37.084 v1(78.603,38.264)
SCLK: U7.13 U8.3 | length 21.3
  Top Layer w0.254: v1(60.909,55.245) 60.909,65.802 61.158,66.051 64.384,66.051 64.624,65.811 64.624,64.489 U8.3@64.635,64.478
  Bottom Layer w0.254: v1(60.909,55.245) 64.67,55.245 v1(65.903,54.012)
SDA: R26.2 U7.33 U13.9 U18.9 | length 38
  Top Layer w0.254: v1(65.748,17.034) 65.748,16.299 66.015,16.032 U13.9@66.015,14.576 ; v1(75.512,17.032) 75.512,16.204 75.684,16.032 U18.9@75.684,14.576
  Ground Layer w0.254: v1@65.764,17.05 66.801,17.05 68.1,15.751 75.261,15.751 75.512,16.002 v1(75.512,17.032) 75.512,37.545 v1(74.793,38.264)
TEMP-1: C59.2 R42.2 R43.2 U18.4 | length 83.2
  Top Layer w0.254: C59.2@22.07,41.563 22.07,42.44 22.299,42.668 30.618,42.668 v1(31.246,42.04) R42.2@31.246,41.538 ; v1(74.684,16.734) U18.4@74.684,18.976
  Bottom Layer w0.254: v1(31.246,42.04) 31.221,42.275 cw(c31.977,42.44) 31.977,43.214 56.384,43.214 57.265,42.332 57.265,33.357 58.546,32.076 67.236,32.076 68.649,30.662 68.649,16.7 69.741,15.608 74.278,15.608 74.684,16.014 v1(74.684,16.734)
TEMP-2: C69.2 R49.2 R50.2 U18.5 | length 94.4
  Top Layer w0.254: C69.2@22.07,55.562 22.07,56.438 22.299,56.667 30.619,56.667 v1(31.246,56.039) R49.2@31.246,55.536 ; v1(73.805,17.634) 74.184,18.013 U18.5@74.184,18.976
  Top Layer w0.381: R50.2@22.07,54.49 C69.2@22.07,55.562
  Bottom Layer w0.254: v1(31.246,56.039) 31.246,57.214 cw(c31.796,57.214) 31.343,57.525 cw(c31.796,57.214) 31.485,57.667 cw(c31.796,57.214) 31.796,57.764 56.038,57.764 58.32,55.481 58.32,33.724 58.945,33.1 67.709,33.1 69.748,31.06 69.748,18.258 70.372,17.634 v1(73.805,17.634)
TEMP-3: C76.2 R55.2 R56.2 U18.6 | length 61.3
  Top Layer w0.254: C76.2@40.612,41.058 40.612,41.935 40.841,42.163 49.161,42.163 v1(49.788,41.536) R55.2@49.788,41.058 R55.2@49.788,41.033 ; v1(73.649,14.562) 74.161,14.562 74.175,14.576 U18.6@74.184,14.576
  Bottom Layer w0.254: v1(49.788,41.536) 49.788,42.141 cw(c50.333,42.141) 50.333,42.686 56.191,42.686 56.698,42.18 56.698,33.201 58.331,31.568 67.025,31.568 68.141,30.452 68.141,16.49 69.509,15.122 73.103,15.122 73.649,14.576 v1(73.649,14.562)
TEMP-4: C83.2 R61.2 R62.2 U18.7 | length 77.3
  Top Layer w0.254: C83.2@40.612,55.612 40.612,56.489 40.841,56.718 49.161,56.718 v1(49.788,56.09) R61.2@49.788,55.587 ; v1(73.805,16.459) 74.684,15.58 U18.7@74.684,14.576
  Top Layer w0.381: R62.2@40.612,54.541 C83.2@40.612,55.562 C83.2@40.612,55.612
  Bottom Layer w0.254: v1(49.788,56.09) 49.788,56.738 cw(c50.306,56.738) 50.306,57.256 55.827,57.256 57.787,55.296 57.787,33.546 58.741,32.592 67.48,32.592 69.157,30.915 69.157,16.949 70.037,16.069 73.414,16.069 v1(73.805,16.459)
TEMP-SNS-1: J3.25 R42.1 R46.1 | length 59.4
  Top Layer w0.254: v1(31.246,40.132) R42.1@31.246,40.653
  Bottom Layer w0.254: J3.25@-12.114,26.158 -10.535,24.579 ccw(c-9.451,25.664) -9.451,24.13 28.567,24.13 30.237,25.8 30.237,39.49 cw(c30.878,39.49) 30.375,39.889 cw(c30.878,39.49) 30.48,39.994 cw(c30.878,39.49) 30.878,40.132 v1(31.246,40.132)
TEMP-SNS-2: J3.29 R49.1 R53.1 | length 52.2
  Top Layer w0.254: v1(31.246,54.094) R49.1@31.246,54.596
  Bottom Layer w0.254: J3.29@-16.314,56.901 -14.601,58.614 cw(c-13.965,57.978) -13.965,58.877 -5.506,58.877 0.971,52.4 22.794,52.4 24.487,54.094 v1(31.246,54.094)
TEMP-SNS-3: J3.33 R55.1 R59.1 | length 109.5
  Top Layer w0.254: v1(49.788,39.641) R55.1@49.788,40.118
  Bottom Layer w0.254: J3.33@-16.314,43.581 -20.095,43.581 ccw(c-20.095,42.446) -20.501,43.506 ccw(c-20.095,42.446) -21.156,42.852 ccw(c-20.095,42.446) -21.231,42.446 -21.231,24.629 -20.182,23.58 28.833,23.58 30.745,25.492 30.745,34.64 cw(c31.664,34.64) 30.874,35.111 cw(c31.664,34.64) 31.193,35.43 cw(c31.664,34.64) 31.664,35.56 49.061,35.56 ccw(c49.061,36.287) 49.326,35.61 ccw(c49.061,36.287) 49.738,36.022 ccw(c49.061,36.287) 49.788,36.287 v1(49.788,39.641)
TEMP-SNS-4: J3.38 R61.1 R65.1 | length 96.7
  Top Layer w0.254: v1(49.788,54.144) R61.1@49.788,54.622
  Bottom Layer w0.254: J3.38@-16.314,26.158 -14.735,27.736 ; -14.735,27.737 cw(c-13.507,26.507) -13.507,28.245 -6.502,28.245 -2.896,24.638 28.27,24.638 29.691,26.059 29.691,42.835 cw(c30.578,42.835) 29.855,43.349 cw(c30.578,42.835) 30.064,43.558 cw(c30.578,42.835) 30.578,43.722 48.962,43.722 49.788,44.548 v1(49.788,54.144)
TNK-SENS-1: D12.2 J3.14 R33.2 U10.1 U13.4 | length 183.8
  Top Layer w0.254: v1(14.156,-2.386) 14.161,-2.391 55.375,-2.391 55.952,-1.813 55.952,13.375 54.991,14.336 54.991,14.379 ; v1(65.015,17.634) U13.4@65.015,18.976
  Bottom Layer w0.178: J3.14@-12.114,66.081 -12.185,66.01 -13.669,64.526 cw(c-14.365,65.222) -14.365,64.238 -22.385,64.238 ccw(c-22.385,63.254) -23.368,63.254 -23.368,63.126 -23.368,10.794 -20.829,8.255 4.391,8.255 5.588,7.058 5.588,-0.719 7.255,-2.386 v1(14.156,-2.386)
  Bottom Layer w0.254: v1(54.515,17.6) 55.512,18.597 64.051,18.597 v1(65.015,17.634)
TNK-SENS-2: D14.2 J3.16 R35.2 U12.1 U13.5 | length 172.6
  Top Layer w0.254: v1(14.859,-1.811) 14.925,-1.877 15.304,-1.877 15.309,-1.883 41.823,-1.883 42.437,-1.269 42.437,13.088 41.087,14.437 41.001,14.437 ; v1(64.135,17.634) 64.515,18.013 U13.5@64.515,18.976
  Bottom Layer w0.178: -13.514,55.501 cw(c-14.18,56.168) -14.18,55.225 -21.734,55.225 ccw(c-21.734,54.1) -22.86,54.1 -22.86,11.004 -20.619,8.763 4.601,8.763 6.096,7.268 6.096,-0.509 7.365,-1.778 14.826,-1.778 v1(14.859,-1.811) ; -13.514,55.501 J3.16@-12.114,56.901
  Bottom Layer w0.254: v1(40.974,17.346) 41.625,16.696 54.543,16.696 55.936,18.089 63.68,18.089 v1(64.135,17.634)